# Altium PCB EVB-2.PCBDOC (part 2 of 6)
Units mil, origin at the board's own origin, x right, y up, seen from the top; angles counter-clockwise.
Board outline 2401.57 x 1771.65 mil, 6 copper layers (Top, Mid1-H, Mid2-PWR, GND, Mid3-V, Bottom), stack 59.449 mil thick; 172 components, 166 nets, 823 pads, 550 vias.
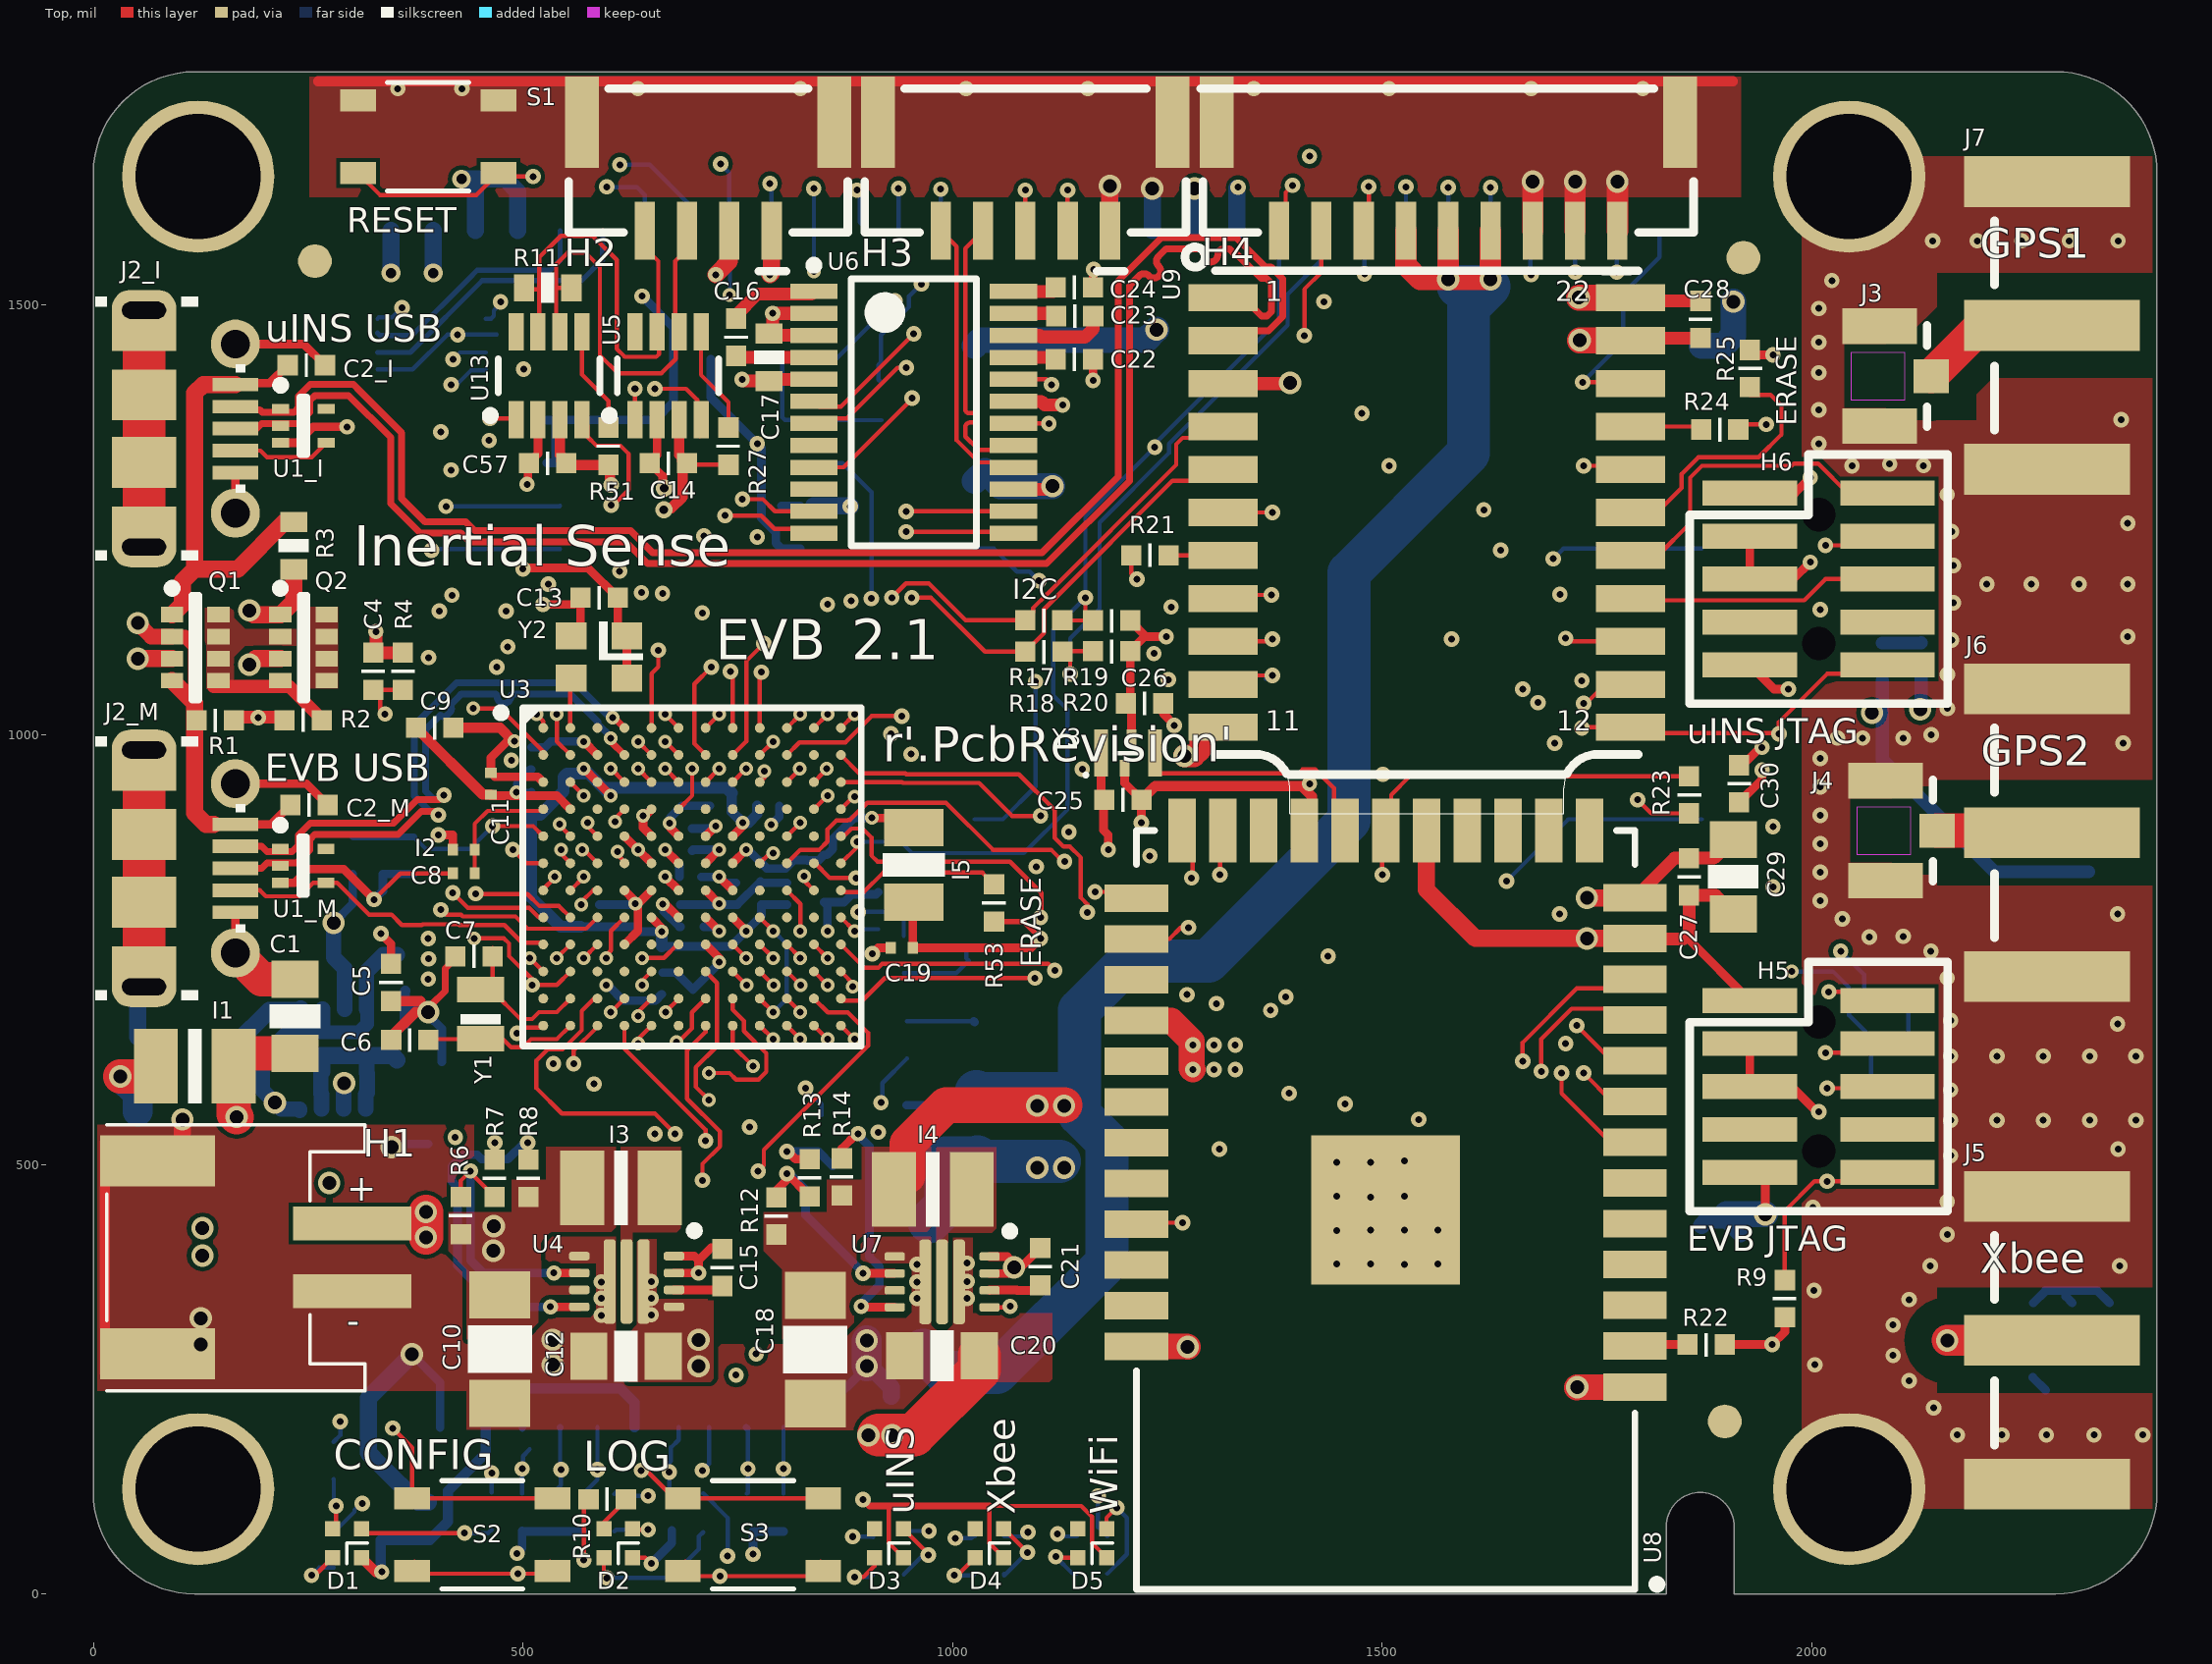
[diagram p0: Top view]

## Part data (continued)
H4: "CONN HEADER GH SIDE 9POS 1.25MM", Colour=Natural, Manufacturer=JST, Manufacturer Part Number=SM09B-GHS-TB(LF)(SN), Supplier Part Number 1=455-1571-2-ND, Connector Type="Outer Shroud Contact", Contact Material=Bronze, Contact Plating=Tin, Fastening Type=Ramp, Housing Colour=Natural, Housing Material=Nylon, Lead Free="Lead Free", Mount="Surface Mount", Number of Contacts=9, Number of Positions=9, Number of Rows=1, Packaging="Cut Tape", Pitch=0.049inch, Stock 1=0, Supplier 1=Digi-Key, Termination=Solder
H5 H6: "CONN HEADER 10POS DUAL .05\" SMD", Housing Colour=Black, Manufacturer=Samtec, Manufacturer Part Number=FTSH-105-01-L-DV-K-A-P, Max Operating Temperature=125°C, Min Operating Temperature=-55°C, Supplier Part Number 1=SAM9440-ND, ComponentLink1Description=http://www.samtec.com/documents/webfiles/pdf/FTSH_SMT.pdf, ComponentLink1URL=http://www.samtec.com/documents/webfiles/pdf/FTSH_SMT.pdf, Contact Material=Bronze, Contact Plating=Gold, Depth=3.43mm, Gender=Male, Housing Material=Polymer, Lead Free="Lead Free", Length=6.35mm, Number of Contacts=10, Number of Rows=2, Orientation=Straight, Packaging=Bulk, Pitch=1.27mm, Pricing 1="1=4.15, 92=3.48598, 184=3.32, 552=2.82199, 1012=2.407 (USD)", Radiation Hardening=No, Stock 1=3679, Supplier 1=Digi-Key, Termination=Solder
H7 H8: "CONN HEADER GH SIDE 14POS 1.25MM", Colour=Natural, Current Rating=1A, Manufacturer=JST, Manufacturer Part Number=SM14B-GHS-TB(LF)(SN), Max Operating Temperature=85°C, Min Operating Temperature=-25°C, Supplier Part Number 1=455-1576-6-ND, Voltage Rating (AC)=50V, Connector Type="Outer Shroud Contact", Contact Material=Bronze, Contact Plating=Tin, Fastening Type=Ramp, Gender=Male, Housing Colour=Natural, Housing Material=Nylon, Lead Free="Lead Free", Mount="Surface Mount", Number of Contacts=14, Number of Positions=14, Number of Rows=1, Packaging="Tape and Reel", Pitch=0.049inch, REACH SVHC="No SVHC", Stock 1=0, Supplier 1=Digi-Key, Termination=Solder, Wire/Cable Gauge=26AWG
H9: "CONN MICRO SD CARD PUSH-PULL R/A", Flammability Rating="UL94 V-0", Manufacturer="Amphenol Commercial", Manufacturer Part Number=114-00841-68, Package Quantity=1, Supplier Part Number 1=114-00841-68-6-ND, ComponentLink1Description=https://datasheet.ciiva.com/683/114-00841-68-683584.pdf, ComponentLink1URL=https://datasheet.ciiva.com/683/114-00841-68-683584.pdf, ComponentLink2Description=https://datasheet.ciiva.com/24241/11400841-283410-24241569.pdf, ComponentLink2URL=https://datasheet.ciiva.com/24241/11400841-283410-24241569.pdf, ComponentLink3Description=https://datasheet.ciiva.com/28408/11400841-28408193.pdf, ComponentLink3URL=https://datasheet.ciiva.com/28408/11400841-28408193.pdf, ComponentLink4Description=https://datasheet.ciiva.com/9464/1140084168-9464901.pdf, ComponentLink4URL=https://datasheet.ciiva.com/9464/1140084168-9464901.pdf, ComponentLink5Description=https://datasheet.ciiva.com/48965/70323450-48965706.pdf, ComponentLink5URL=https://datasheet.ciiva.com/48965/70323450-48965706.pdf, ComponentLink6Description=https://datasheet.ciiva.com/16655/1140084168-16655293.pdf, ComponentLink6URL=https://datasheet.ciiva.com/16655/1140084168-16655293.pdf, Connector Type=Connector, Contact Material="Copper,Copper Alloy", Contact Plating=Gold, Depth=11.45mm, Gender=Receptacle, Height=1.55mm, Housing Material=Polymer, Lead Free="Lead Free", Length=15.6mm, Mount="Surface Mount", Number of Contacts=8, Number of Rows=1, Orientation="Right Angle", Packaging="Tape and Reel", Pitch=1.1mm, Pricing 1="1=1.31, 10=1.188, 25=1.1156, 50=1.0672, 100=1.0187, 250=0.92168, 500=0.84892 (USD)", Radiation Hardening=No, REACH SVHC=Unknown, Stock 1=42391, Supplier 1=Digi-Key, Termination=SMD/SMT
I1 I3 I4 I8: "FIXED IND 1UH 3.3A 40 MOHM", Case/Package=1008, Case Code (Metric)=2520, Current Rating=3.3A, DC Resistance (DCR)=40mR, Inductance=1uh, Manufacturer=Murata, Manufacturer Part Number=DFE252012F-1R0M=P2, Max Operating Temperature=125°C, Min Operating Temperature=-40°C, Saturation Current=5.3A, Supplier Part Number 1=490-13053-6-ND, Test Frequency=1MHz, Tolerance=20%, Case Code (Imperial)=1008, ComponentLink1Description=http://www.murata.com/~/media/webrenewal/products/inductor/chip/tokoproducts/wirewoundmetalalloychiptype/m_dfe252012f.ashx, ComponentLink1URL=http://www.murata.com/~/media/webrenewal/products/inductor/chip/tokoproducts/wirewoundmetalalloychiptype/m_dfe252012f.ashx, ComponentLink2Description=https://www.murata.com/~/media/webrenewal/products/inductor/chip/tokoproducts/wirewoundmetalalloychiptype/m_dfe252012f.ashx, ComponentLink2URL=https://www.murata.com/~/media/webrenewal/products/inductor/chip/tokoproducts/wirewoundmetalalloychiptype/m_dfe252012f.ashx, Core Material=Ferrite, Height - Seated (Max)=0.047inch, Length=0.098inch, Mount="Surface Mount", Packaging="Tape and Reel", Pricing 1="1=0.67, 10=0.584, 100=0.4169, 500=0.35018, 1000=0.28348 (USD)", Shielding=Shielded, Stock 1=122372, Supplier 1=Digi-Key, Width=0.079inch
I2: "FERRITE BEAD 240 OHM 0201 1LN", Current Rating (Max)=420mA, DC Resistance (DCR) (Max)="320 mOhm", Impedance @ Frequency="240 Ohm @ 100MHz", Manufacturer="TDK Corporation", Manufacturer Part Number=MMZ0603S241HT000, Operating Temperature="-55°C ~ 125°C", Package / Case="0201 (0603 Metric)", Ratings=-, Supplier Part Number 1=445-172341-1-ND, Category=Filters, ComponentLink1Description=https://product.tdk.com/info/en/catalog/datasheets/beads_commercial_signal_mmz0603_en.pdf, ComponentLink1URL=https://product.tdk.com/info/en/catalog/datasheets/beads_commercial_signal_mmz0603_en.pdf, Filter Type="Signal Line", Height (Max)="0.013\" (0.33mm)", Mounting Type="Surface Mount", Number of Lines=1, Packaging="Cut Tape (CT)", Pricing 1="1=0.13, 10=0.109, 100=0.0605, 250=0.0484, 500=0.04356, 1000=0.0363, 5000=0.03388 (USD)", RoHS="RoHS Compliant", Size / Dimension="0.024\" L x 0.012\" W (0.60mm x 0.30mm)", Stock 1=16894, Supplier 1=Digi-Key
I5: "FIXED IND 10UH 350MA 1.066 OHM", Case/Package=0806, Case Code (Metric)=2016, Current Rating=350mA, DC Resistance (DCR)=1.066R, Inductance=10uH, Inductance Tolerance=20%, Manufacturer="Taiyo Yuden", Manufacturer Part Number=CBC2016T100M, Max Operating Temperature=105°C, Min Operating Temperature=-40°C, Package Quantity=2000, Saturation Current=380mA, Self Resonant Frequency=32MHz, Supplier Part Number 1=587-1606-1-ND, Test Frequency=2.52MHz, Case Code (Imperial)=0806, ComponentLink1Description=https://datasheet.ciiva.com/8505/brc2016t100k-ss-8505634.pdf, ComponentLink1URL=https://datasheet.ciiva.com/8505/brc2016t100k-ss-8505634.pdf, ComponentLink2Description=https://datasheet.ciiva.com/7648/wound07-e-7648376.pdf, ComponentLink2URL=https://datasheet.ciiva.com/7648/wound07-e-7648376.pdf, ComponentLink3Description=https://datasheet.ciiva.com/6701/wound07-e-6701195.pdf, ComponentLink3URL=https://datasheet.ciiva.com/6701/wound07-e-6701195.pdf, ComponentLink4Description=https://datasheet.ciiva.com/6701/wound07-e-6701196.pdf, ComponentLink4URL=https://datasheet.ciiva.com/6701/wound07-e-6701196.pdf, ComponentLink5Description=https://datasheet.ciiva.com/6701/wound07-e-6701197.pdf, ComponentLink5URL=https://datasheet.ciiva.com/6701/wound07-e-6701197.pdf, Composition=Wirewound, Core Material=Ferrite, DC Current=350mA, Depth=1.8mm, Halogen Free="Halogen Free", Height=1.6mm, Height - Seated (Max)=0.071inch, Lead Free="Lead Free", Length=0.079inch, Max DC Current=350mA, Military Standard=Not, Mount="Surface Mount", Number of Pins=2, Packaging="Tape and Reel", Pricing 1="1=0.25, 10=0.221, 100=0.1518, 500=0.12972, 1000=0.09936 (USD)", Radiation Hardening=No, REACH SVHC=Unknown, Shielding=Unshielded, Stock 1=43283, Supplier 1=Digi-Key, Termination=SMD/SMT, Tolerance=20%, Width=0.063inch
I6 I7: "FERRITE BEAD 470 OHM 0402", Case/Package=0402, Case Code (Metric)=1005, DC Resistance (DCR)=450mR, Frequency=100MHz, Manufacturer="Taiyo Yuden", Manufacturer Part Number=BK1005HM471-T, Max Current Rating=250mA, Max Operating Temperature=125°C, Min Operating Temperature=-55°C, Package Quantity=10, Supplier Part Number 1=587-1838-6-ND, Tolerance=25%, Case Code (Imperial)=0402, Core Material=Ferrite, Depth=0.55mm, Halogen Free="Halogen Free", Height=0.022inch, Impedance=470R, Lead Free="Lead Free", Length=0.039inch, Max DC Current=250mA, Mount="Surface Mount", Number of Lines=1, Number of Pins=2, Packaging="Tape and Reel", Pricing 1="1=0.1, 10=0.041, 25=0.0364, 50=0.033, 100=0.0297, 250=0.0218, 500=0.01584, 1000=0.01551, 5000=0.01056 (USD)", Shielding=Unshielded, Stock 1=18500, Supplier 1=Digi-Key, Termination=SMD/SMT, Test Frequency=100MHz, Width=0.02inch
J2_I J2_M: library part USB-TYPEAB-4GND, "CONN USB MICRO B RECPT SMT R/A", Colour=Black, Current Rating=1.8A, Flammability Rating="UL94 V-0", Insulation Resistance=1GR, Manufacturer="Amphenol FCI", Manufacturer Part Number=10118194-0001LF, Max Operating Temperature=85°C, Max Voltage Rating (AC)=100V, Min Operating Temperature=-55°C, Package Quantity=9600, Supplier Part Number 1=609-4618-6-ND, ComponentLink1Description=https://datasheet.ciiva.com/851/10118194-851110.pdf, ComponentLink1URL=https://datasheet.ciiva.com/851/10118194-851110.pdf, ComponentLink2Description=https://datasheet.ciiva.com/851/10118194-851111.pdf, ComponentLink2URL=https://datasheet.ciiva.com/851/10118194-851111.pdf, ComponentLink3Description=https://datasheet.ciiva.com/4598/10118194ac-197217-4598807.pdf, ComponentLink3URL=https://datasheet.ciiva.com/4598/10118194ac-197217-4598807.pdf, ComponentLink4Description=https://datasheet.ciiva.com/29907/10118194-29907230.pdf, ComponentLink4URL=https://datasheet.ciiva.com/29907/10118194-29907230.pdf, ComponentLink5Description=https://datasheet.ciiva.com/26945/getdatasheetpartid-418619-26945695.pdf, ComponentLink5URL=https://datasheet.ciiva.com/26945/getdatasheetpartid-418619-26945695.pdf, Connector Type=USB,Receptacle, Contact Material="Copper Alloy", Contact Plating=Gold, Depth=5mm, Features=Shielded, Gender=Receptacle, Housing Material=Polymer, Lead Free="Lead Free", Length=8.05mm, Mount="Surface Mount,Horizontal", Number of Contacts=5, Number of Ports=1, Number of Terminals=5, Orientation="Right Angle", Packaging="Tape and Reel", Pitch=0.65mm, Pricing 1="1=0.5, 10=0.464, 25=0.418, 50=0.3716, 100=0.3561, 250=0.32516, 500=0.30966 (USD)", Radiation Hardening=No, Stock 1=178809, Supplier 1=Digi-Key, Termination=Solder